# Altium PCB photo_frame-v1.2.PcbDoc (part 5 of 5)
Units mm, origin at the board's own origin, x right, y up, seen from the top; angles counter-clockwise.
Board outline 704 x 370 mm, 2 copper layers (Top Layer, Bottom Layer), stack 1.57 mm thick; 268 components, 235 nets, 1088 pads, 1398 vias.
Unrouted connection lines stored in the file: 10.
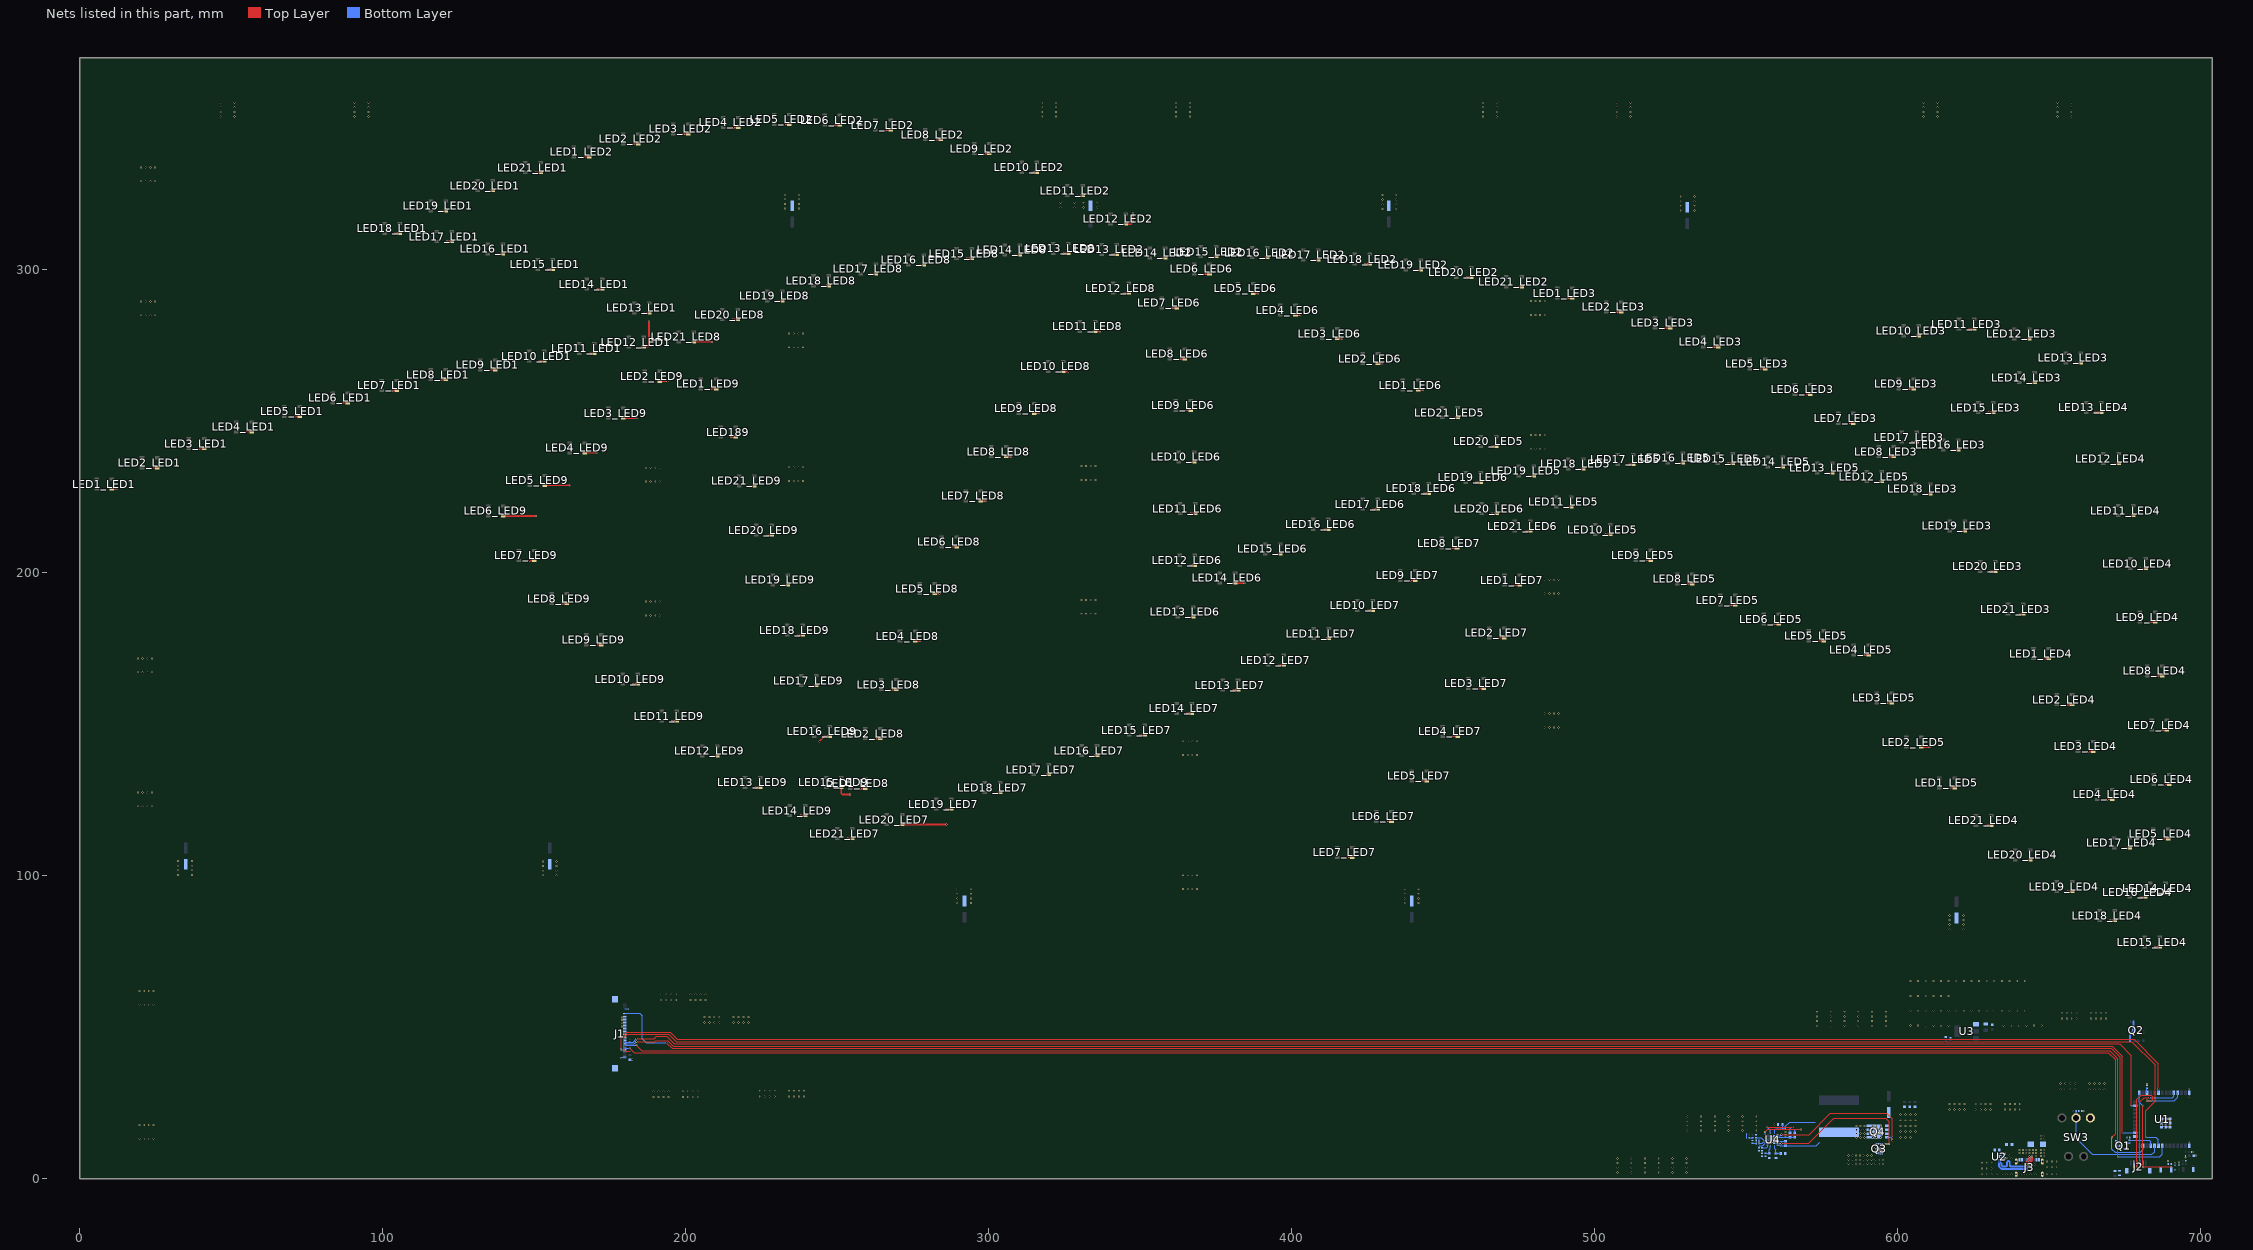
[diagram p4: the nets of this part, all layers, seen from the top]

## Via types
v1: diameter 0.6, hole 0.3, Top Layer to Bottom Layer, 709 vias
v2: diameter 0.6, hole 0.3, Top Layer to Bottom Layer, tented both sides, 689 vias

## Nets (pads, with @x,y where several pads share a name; then routed paths per layer and width w, separated by ;. In a path a pad name is that pad's centre, name@x,y a point inside that pad or via, vN(x,y) a via of type N, cw(c..) or ccw(c..) an arc to the next point about the centre after c; other vN are vias at no path point) (continued)
GND: C1.1 C2.1 C3.1 C4.1 C5.1 C6.1 C7.2 C8.1 C9.1 C10.1 C11.1 C12.1 C14.1 C15.1 C16.1 C17.1 C19.1 C20.1 C23.2 C24.2 C25.2 C26.2 C27.2 C28.2 C29.2 C30.2 C31.2 C32.2 C33.1 D1.1 D2.1 D3.1 D4.1 J1.5 J1.16 J1.17 J1.18 J1.19 J1.20 J1.21 J1.22 J1.23 J1.24 J1.25 J1.26 J1.27 J1.28 J1.29 J1.30 J1.31 J1.32 J1.37 J1.MP1 J1.MP2 J2.2 J2.MP1 J2.MP2 J3.A1/B12 J3.B1/A12 J3.S1 J3.S2 J3.S3 J3.S4 LED1_LED1.3 LED1_LED2.3 LED1_LED3.3 LED1_LED4.3 LED1_LED5.3 LED1_LED6.3 LED1_LED7.3 LED1_LED8.3 LED1_LED9.3 LED2_LED1.3 LED2_LED2.3 LED2_LED3.3 LED2_LED4.3 LED2_LED5.3 LED2_LED6.3 LED2_LED7.3 LED2_LED8.3 LED2_LED9.3 LED3_LED1.3 LED3_LED2.3 LED3_LED3.3 LED3_LED4.3 LED3_LED5.3 LED3_LED6.3 LED3_LED7.3 LED3_LED8.3 LED3_LED9.3 LED4_LED1.3 LED4_LED2.3 LED4_LED3.3 LED4_LED4.3 LED4_LED5.3 LED4_LED6.3 LED4_LED7.3 LED4_LED8.3 LED4_LED9.3 LED5_LED1.3 LED5_LED2.3 LED5_LED3.3 LED5_LED4.3 LED5_LED5.3 LED5_LED6.3 LED5_LED7.3 LED5_LED8.3 LED5_LED9.3 LED6_LED1.3 LED6_LED2.3 LED6_LED3.3 LED6_LED4.3 LED6_LED5.3 LED6_LED6.3 LED6_LED7.3 LED6_LED8.3 LED6_LED9.3 LED7_LED1.3 LED7_LED2.3 LED7_LED3.3 LED7_LED4.3 LED7_LED5.3 LED7_LED6.3 LED7_LED7.3 LED7_LED8.3 LED7_LED9.3 LED8_LED1.3 LED8_LED2.3 LED8_LED3.3 LED8_LED4.3 LED8_LED5.3 LED8_LED6.3 LED8_LED7.3 LED8_LED8.3 LED8_LED9.3 LED9_LED1.3 LED9_LED2.3 LED9_LED3.3 LED9_LED4.3 LED9_LED5.3 LED9_LED6.3 LED9_LED7.3 LED9_LED8.3 LED9_LED9.3 LED10_LED1.3 LED10_LED2.3 LED10_LED3.3 LED10_LED4.3 LED10_LED5.3 LED10_LED6.3 LED10_LED7.3 LED10_LED8.3 LED10_LED9.3 LED11_LED1.3 LED11_LED2.3 LED11_LED3.3 LED11_LED4.3 LED11_LED5.3 LED11_LED6.3 LED11_LED7.3 LED11_LED8.3 LED11_LED9.3 LED12_LED1.3 LED12_LED2.3 LED12_LED3.3 LED12_LED4.3 LED12_LED5.3 LED12_LED6.3 LED12_LED7.3 LED12_LED8.3 LED12_LED9.3 LED13_LED1.3 LED13_LED2.3 LED13_LED3.3 LED13_LED4.3 LED13_LED5.3 LED13_LED6.3 LED13_LED7.3 LED13_LED8.3 LED13_LED9.3 LED14_LED1.3 LED14_LED2.3 LED14_LED3.3 LED14_LED4.3 LED14_LED5.3 LED14_LED6.3 LED14_LED7.3 LED14_LED8.3 LED14_LED9.3 LED15_LED1.3 LED15_LED2.3 LED15_LED3.3 LED15_LED4.3 LED15_LED5.3 LED15_LED6.3 LED15_LED7.3 LED15_LED8.3 LED15_LED9.3 LED16_LED1.3 LED16_LED2.3 LED16_LED3.3 LED16_LED4.3 LED16_LED5.3 LED16_LED6.3 LED16_LED7.3 LED16_LED8.3 LED16_LED9.3 LED17_LED1.3 LED17_LED2.3 LED17_LED3.3 LED17_LED4.3 LED17_LED5.3 LED17_LED6.3 LED17_LED7.3 LED17_LED8.3 LED17_LED9.3 LED18_LED1.3 LED18_LED2.3 LED18_LED3.3 LED18_LED4.3 LED18_LED5.3 LED18_LED6.3 LED18_LED7.3 LED18_LED8.3 LED18_LED9.3 LED19_LED1.3 LED19_LED2.3 LED19_LED3.3 LED19_LED4.3 LED19_LED5.3 LED19_LED6.3 LED19_LED7.3 LED19_LED8.3 LED19_LED9.3 LED20_LED1.3 LED20_LED2.3 LED20_LED3.3 LED20_LED4.3 LED20_LED5.3 LED20_LED6.3 LED20_LED7.3 LED20_LED8.3 LED20_LED9.3 LED21_LED1.3 LED21_LED2.3 LED21_LED3.3 LED21_LED4.3 LED21_LED5.3 LED21_LED6.3 LED21_LED7.3 LED21_LED8.3 LED21_LED9.3 LED189.3 LED224.2 Q1.2 Q4.1 Q4.2 Q4.3 R3.2 R7.2 R9.2 R16.1 R17.1 R19.1 SW1.1 SW2.1 SW3.3 U1.1 U1.15 U1.38 U1.39 U1.39_10 U1.39_11 U1.39_12 U1.39_13 U1.39_14 U1.39_15 U1.39_16 U1.39_17 U1.39_18 U1.39_19 U1.39_20 U1.39_21 U1.40 U1.41 U1.42 U1.43 U1.44 U1.45 U1.46 U1.47 U2.7 U3.1 U4.6 U4.12 U4.15 U4.21 U4.22 U4.23 U4.24 U4.25 U4.26 U4.27 U4.28 U4.29 | length 369.7
  Top Layer w0.559: LED1_LED1.3@10.688,227.545 v2@12.284,227.545 ; v2@24.021,234.602 LED2_LED1.3@25.617,234.602 ; v2@39.495,240.903 LED3_LED1.3@41.091,240.903 ; v2@55.187,246.464 LED4_LED1.3@56.783,246.464 ; v2@71.037,251.569 LED5_LED1.3@72.632,251.569 ; v2@86.963,256.04 LED6_LED1.3@88.558,256.04 ; v2@103.168,260.104 LED7_LED1.3@104.763,260.104 ; v2@104.074,311.989 LED18_LED1.3@105.669,311.989 ; v2@119.297,263.71 LED8_LED1.3@120.892,263.71 ; v2@119.347,319.361 LED19_LED1.3@120.943,319.361 ; v2@121.256,309.268 LED17_LED1.3@122.852,309.268 ; v2@134.849,326.061 LED20_LED1.3@136.444,326.061 ; v2@135.617,266.928 LED9_LED1.3@137.213,266.928 ; v2@138.07,305.227 LED16_LED1.3@139.666,305.227 ; LED6_LED9.3@139.841,218.702 139.845,218.698 150.618,218.698 v2(150.622,218.694) ; v2@148.431,203.995 LED7_LED9.3@150.026,203.995 ; v2@150.564,332.036 LED21_LED1.3@152.16,332.036 ; v2@151.86,269.832 LED10_LED1.3@153.455,269.832 ; LED5_LED9.3@153.557,228.785 153.56,228.788 161.818,228.788 v2(161.821,228.791) ; v2@154.664,300.081 LED15_LED1.3@156.259,300.081 ; v2@159.226,189.796 LED8_LED9.3@160.821,189.796 ; v2@166.592,337.218 LED1_LED2.3@168.187,337.218 ; LED4_LED9.3@166.765,239.504 v2(170.688,239.504) ; v2@168.268,272.321 LED11_LED1.3@169.864,272.321 ; v2@170.605,176.182 LED9_LED9.3@172.2,176.182 ; v2@170.862,293.573 LED14_LED1.3@172.458,293.573 ; LED3_LED9.3@179.49,250.985 v2(183.896,250.985) ; v2@182.67,163.203 LED10_LED9.3@184.265,163.203 ; v2@182.822,341.511 LED2_LED2.3@184.418,341.511 ; LED12_LED1.3@186.28,274.449 186.348,274.518 187.529,274.518 187.96,274.949 v2(187.96,282.956) ; v2@186.471,285.699 LED13_LED1.3@188.067,285.699 ; LED2_LED9.3@191.504,263.152 191.508,263.148 194.052,263.148 v2(194.056,263.144) ; v2@195.522,150.985 LED11_LED9.3@197.118,150.985 ; v2@199.332,344.762 LED3_LED2.3@200.928,344.762 ; LED21_LED8.3@202.782,276.156 208.718,276.156 208.777,276.098 v2(208.788,276.098) ; v2@208.502,260.637 LED1_LED9.3@210.097,260.637 ; v2@208.883,139.53 LED12_LED9.3@210.478,139.53 ; v2@215.055,244.737 LED189.3@216.65,244.737 ; v2@215.588,283.522 LED20_LED8.3@217.184,283.522 ; v2@215.893,346.921 LED4_LED2.3@217.489,346.921 ; v2@221.125,228.633 LED21_LED9.3@222.721,228.633 ; v2@223.056,129.09 LED13_LED9.3@224.651,129.09 ; v2@226.815,212.352 LED20_LED9.3@228.411,212.352 ; v2@230.396,289.644 LED19_LED8.3@231.992,289.644 ; v2@232.174,195.943 LED19_LED9.3@233.77,195.943 ; v2@232.632,347.962 LED5_LED2.3@234.227,347.962 ; v2@237.051,179.332 LED18_LED9.3@238.647,179.332 ; v2@237.864,119.794 LED14_LED9.3@239.46,119.794 ; v2@241.612,162.67 LED17_LED9.3@243.208,162.67 ; v2(244.165,144.272) 245.841,145.948 LED16_LED9.3@247.569,145.948 ; v2@245.662,294.673 LED18_LED8.3@247.257,294.673 ; v2@249.345,347.683 LED6_LED2.3@250.94,347.683 ; LED15_LED9.3@251.414,129.078 251.414,127.105 251.742,126.778 v2(254.297,126.778) ; v2@253.465,112.233 LED21_LED7.3@255.06,112.233 ; v2@257.803,128.76 LED1_LED8.3@259.399,128.76 ; v2@261.257,298.559 LED17_LED8.3@262.853,298.559 ; v2@262.705,145.194 LED2_LED8.3@264.301,145.194 ; v2@266.083,346.032 LED7_LED2.3@267.679,346.032 ; v2@268.014,161.399 LED3_LED8.3@269.609,161.399 ; LED20_LED7.3@271.489,116.848 271.493,116.844 286.146,116.844 v2(286.149,116.84) ; LED4_LED8.3@275.807,177.376 v2@277.403,177.376 ; v2@276.991,301.555 LED16_LED8.3@278.586,301.555 ; LED5_LED8.3@282.284,193.073 v2@283.88,193.073 ; v2@282.593,342.908 LED8_LED2.3@284.189,342.908 ; v2@286.149,121.928 LED19_LED7.3@287.745,121.928 ; v2@287.978,208.516 LED6_LED8.3@289.574,208.516 ; v2@292.855,303.639 LED15_LED8.3@294.451,303.639 ; LED7_LED8.3@297.448,223.629 v2@299.043,223.629 ; v2@298.722,338.285 LED9_LED2.3@300.318,338.285 ; v2@302.253,127.363 LED18_LED7.3@303.849,127.363 ; LED8_LED8.3@305.881,238.285 v2@307.476,238.285 ; v2@308.806,304.884 LED14_LED8.3@310.402,304.884 ; v2@314.42,332.138 LED10_LED2.3@316.015,332.138 ; LED9_LED8.3@315.05,252.585 v2@316.646,252.585 ; v2@318.331,133.281 LED17_LED7.3@319.927,133.281 ; LED10_LED8.3@324.727,266.377 v2@326.323,266.377 ; v2@324.797,305.367 LED13_LED8.3@326.393,305.367 ; v2@329.482,324.416 LED11_LED2.3@331.077,324.416 ; v2@334.232,139.555 LED16_LED7.3@335.827,139.555 ; LED11_LED8.3@335.192,279.611 v2@336.788,279.611 ; v2@340.759,305.036 LED13_LED2.3@342.355,305.036 ; v2@344.646,292.209 LED12_LED8.3@346.241,292.209 ; LED12_LED2.3@345.276,315.069 347.073,315.069 347.726,315.722 v2(347.726,318.516) ; v2@349.929,146.362 LED15_LED7.3@351.524,146.362 ; v2@356.674,303.867 LED14_LED2.3@358.27,303.867 ; v2@360.602,287.336 LED7_LED6.3@362.198,287.336 ; v2@363.238,270.518 LED8_LED6.3@364.834,270.518 ; v2@365.158,253.575 LED9_LED6.3@366.754,253.575 ; v2@365.55,153.525 LED14_LED7.3@367.145,153.525 ; v2@365.931,185.377 LED13_LED6.3@367.526,185.377 ; v2@366.261,236.558 LED10_LED6.3@367.857,236.558 ; v2@366.53,202.421 LED12_LED6.3@368.125,202.421 ; v2@366.693,219.489 LED11_LED6.3@368.288,219.489 ; v2@371.37,298.564 LED6_LED6.3@372.965,298.564 ; v2@373.55,304.261 LED15_LED2.3@375.146,304.261 ; v2@380.775,161.246 LED13_LED7.3@382.371,161.246 ; LED14_LED6.3@381.369,196.578 v2(384.556,196.578) ; LED5_LED6.3@387.348,292.165 v2@388.944,292.165 ; v2@390.485,303.944 LED16_LED2.3@392.081,303.944 ; v2@394.76,206.205 LED15_LED6.3@396.355,206.205 ; v2@395.801,169.476 LED12_LED7.3@397.397,169.476 ; LED4_LED6.3@401.342,284.976 v2@402.937,284.976 ; v2@407.327,303.195 LED17_LED2.3@408.923,303.195 ; v2@410.533,214.307 LED16_LED6.3@412.129,214.307 ; v2@410.711,178.189 LED11_LED7.3@412.307,178.189 ; LED3_LED6.3@415.134,277.209 v2@416.729,277.209 ; v2@418.483,106.027 LED7_LED7.3@420.079,106.027 ; v2@424.234,301.839 LED18_LED2.3@425.83,301.839 ; v2@425.189,187.536 LED10_LED7.3@426.785,187.536 ; v2@426.942,220.937 LED17_LED6.3@428.537,220.937 ; LED2_LED6.3@428.571,268.938 v2@430.166,268.938 ; v2@431.437,117.914 LED6_LED7.3@433.033,117.914 ; v2@439.311,197.442 LED9_LED7.3@440.907,197.442 ; v2@441.076,299.925 LED19_LED2.3@442.672,299.925 ; LED1_LED6.3@441.805,260.229 v2@443.4,260.229 ; v2@443.121,131.275 LED5_LED7.3@444.717,131.275 ; v2@443.731,226.118 LED18_LED6.3@445.327,226.118 ; v2@453.053,208.059 LED8_LED7.3@454.648,208.059 ; v2@453.212,251.132 LED21_LED5.3@454.808,251.132 ; v2@453.358,145.956 LED4_LED7.3@454.953,145.956 ; v2@457.831,297.46 LED20_LED2.3@459.426,297.46 ; v2@460.876,229.751 LED19_LED6.3@462.472,229.751 ; v2@461.841,161.78 LED3_LED7.3@463.437,161.78 ; v2@465.967,241.664 LED20_LED5.3@467.562,241.664 ; v2@466.21,219.464 LED20_LED6.3@467.806,219.464 ; v2@468.699,178.468 LED2_LED7.3@470.295,178.468 ; v2@473.728,195.842 LED1_LED7.3@475.324,195.842 ; v2@474.353,294.342 LED21_LED2.3@475.948,294.342 ; v2@477.183,213.672 LED21_LED6.3@478.778,213.672 ; v2@478.405,231.906 LED19_LED5.3@480.001,231.906 ; v2@490.746,221.724 LED11_LED5.3@492.342,221.724 ; v2@491.077,290.584 LED1_LED3.3@492.672,290.584 ; v2@494.703,234.258 LED18_LED5.3@496.298,234.258 ; v2@503.624,212.555 LED10_LED5.3@505.22,212.555 ; v2@507.333,286.037 LED2_LED3.3@508.928,286.037 ; v2@511.185,235.681 LED17_LED5.3@512.781,235.681 ; v2@516.985,204.071 LED9_LED5.3@518.58,204.071 ; v2@523.411,280.754 LED3_LED3.3@525.006,280.754 ; v2@527.845,236.201 LED16_LED5.3@529.441,236.201 ; v2@530.751,196.273 LED8_LED5.3@532.347,196.273 ; v2@539.26,274.48 LED4_LED3.3@540.856,274.48 ; v2@544.094,235.999 LED15_LED5.3@545.69,235.999 ; v2@544.899,189.263 LED7_LED5.3@546.495,189.263 ; v2@554.729,267.241 LED5_LED3.3@556.325,267.241 ; v2@559.286,182.99 LED6_LED5.3@560.882,182.99 ; v2@560.552,234.927 LED14_LED5.3@562.148,234.927 ; v2@569.615,258.843 LED6_LED3.3@571.211,258.843 ; v2@574.084,177.503 LED5_LED5.3@575.679,177.503 ; v2@576.961,232.92 LED13_LED5.3@578.557,232.92 ; v2@583.904,249.288 LED7_LED3.3@585.5,249.288 ; v2@588.943,172.829 LED4_LED5.3@590.538,172.829 ; v2@593.225,230.006 LED12_LED5.3@594.82,230.006 ; v2(596.844,157.008) 596.846,157.007 598.182,157.007 LED3_LED5.3@598.184,157.005 ; v2@597.197,238.29 LED8_LED3.3@598.792,238.29 ; v2@603.867,260.634 LED9_LED3.3@605.463,260.634 ; v2@604.794,243.053 LED17_LED3.3@606.39,243.053 ; v2@605.483,278.175 LED10_LED3.3@607.079,278.175 ; LED2_LED5.3@607.861,142.4 v2(610.616,142.4) ; v2@609.282,226.008 LED18_LED3.3@610.878,226.008 ; v2(617.474,128.947) 617.476,128.945 618.875,128.945 LED1_LED5.3@618.877,128.944 ; v2@618.498,240.492 LED16_LED3.3@620.093,240.492 ; v2@620.658,213.798 LED19_LED3.3@622.254,213.798 ; v2@623.74,280.37 LED11_LED3.3@625.336,280.37 ; v2@629.362,116.562 LED21_LED4.3@630.957,116.562 ; v2@630.054,252.813 LED15_LED3.3@631.65,252.813 ; v2@630.783,200.379 LED20_LED3.3@632.378,200.379 ; v2@639.925,186.259 LED21_LED3.3@641.52,186.259 ; v2@641.955,277.165 LED12_LED3.3@643.551,277.165 ; v2(642.874,105.156) 642.878,105.16 643.927,105.16 LED20_LED4.3@643.931,105.164 ; v2@643.666,262.669 LED14_LED3.3@645.261,262.669 ; v2@648.339,171.588 LED1_LED4.3@649.935,171.588 ; v2@656.046,156.444 LED2_LED4.3@657.642,156.444 ; v2@656.063,94.716 LED19_LED4.3@657.658,94.716 ; v2@658.92,269.22 LED13_LED3.3@660.515,269.22 ; v2@663.018,140.978 LED3_LED4.3@664.614,140.978 ; v2(665.226,252.851) 665.228,252.849 667.277,252.849 LED13_LED4.3@667.279,252.848 ; v2@669.345,125.158 LED4_LED4.3@670.941,125.158 ; v2@670.223,85.14 LED18_LED4.3@671.819,85.14 ; v2@671.409,235.937 LED12_LED4.3@673.004,235.937 ; v2@675.02,109.155 LED17_LED4.3@676.615,109.155 ; v2@676.242,218.781 LED11_LED4.3@677.838,218.781 ; v2@680.178,92.89 LED16_LED4.3@681.773,92.89 ; v2@680.323,201.306 LED10_LED4.3@681.918,201.306 ; v2@683.478,183.681 LED9_LED4.3@685.074,183.681 ; v2@684.98,76.411 LED15_LED4.3@686.576,76.411 ; v2@685.899,165.903 LED8_LED4.3@687.495,165.903 ; v2@686.896,94.23 LED14_LED4.3@688.491,94.23 ; v2@687.379,148.02 LED7_LED4.3@688.974,148.02 ; v2@687.857,112.125 LED5_LED4.3@689.453,112.125 ; v2@688.092,130.092 LED6_LED4.3@689.688,130.092
  Bottom Layer w0.203: v2(178.664,39.675) 179.035,40.046 J1.5@180.165,40.046 ; C7.2@181.686,39.243 v2(182.423,39.243) ; v2(674.548,9.804) 674.553,9.809 Q1.2@675.538,9.809
  Bottom Layer w0.254: J1.37@179.985,56.046 v2@181.305,56.046
  Bottom Layer w0.305: C6.1@635.435,6.687 636.15,6.687 v1(636.168,6.706) ; J2.2@678.053,5.137 678.053,3.858 v2(678.064,3.847)
  Bottom Layer w0.381: v2@181.305,56.046 v2(181.305,56.058)
  other v1: 627.888,1.412 629.523,1.412 631.157,1.412 632.792,1.412 634.426,1.412 636.061,1.412 637.695,1.412 649.354,1.412 650.988,1.412 652.623,1.412 507.619,2.032 512.166,2.032 516.712,2.032 521.259,2.032 525.805,2.032 530.352,2.032 627.888,3.302 629.523,3.302 631.157,3.302 507.619,3.556 512.166,3.556 516.712,3.556 521.259,3.556 525.805,3.556 530.352,3.556 649.354,3.702 650.988,3.702 652.623,3.702 507.619,5.08 512.166,5.08 516.712,5.08 521.259,5.08 525.805,5.08 530.352,5.08 627.888,5.192 629.523,5.192 631.157,5.192 649.354,5.592 650.988,5.592 652.623,5.592 507.619,6.604 512.166,6.604 516.712,6.604 521.259,6.604 525.805,6.604 530.352,6.604 637.695,6.706 633.158,7.211 634.047,7.211 647.399,7.476 648.488,7.476 636.932,7.637 647.399,8.458 648.488,8.458 647.399,9.44 648.488,9.44 561.734,12.974 647.399,13.131 648.488,13.131 19.816,13.161 21.34,13.161 22.864,13.161 24.388,13.161 601.072,13.594 602.706,13.594 604.341,13.594 555.871,13.619 647.399,14.112 648.488,14.112 563.055,15.395 601.072,15.484 602.706,15.484 604.341,15.484 605.975,15.484 530.661,15.876 535.208,15.876 539.754,15.876 544.301,15.876 548.847,15.876 553.394,15.876 601.072,17.374 602.706,17.374 604.341,17.374 605.975,17.374 530.661,17.4 535.208,17.4 539.754,17.4 544.301,17.4 548.847,17.4 553.394,17.4 19.816,17.707 21.34,17.707 22.864,17.707 24.388,17.707 559.347,17.877 530.661,18.924 535.208,18.924 539.754,18.924 544.301,18.924 548.847,18.924 553.394,18.924 601.072,19.263 602.706,19.263 604.341,19.263 605.975,19.263 530.661,20.448 535.208,20.448 539.754,20.448 544.301,20.448 548.847,20.448 553.394,20.448 601.072,21.153 602.706,21.153 604.341,21.153 605.975,21.153 617.233,22.742 618.867,22.742 620.502,22.742 622.136,22.742 625.856,22.742 627.491,22.742 629.125,22.742 630.76,22.742 635.508,22.742 637.143,22.742 638.777,22.742 640.412,22.742 617.233,24.632 618.867,24.632 620.502,24.632 622.136,24.632 625.856,24.632 627.491,24.632 629.125,24.632 630.76,24.632 635.508,24.632 637.143,24.632 638.777,24.632 640.412,24.632 189.484,26.924 191.119,26.924 192.753,26.924 194.388,26.924 199.136,26.924 200.771,26.924 202.405,26.924 204.04,26.924 224.536,27.066 226.171,27.066 227.805,27.066 229.44,27.066 234.188,27.066 235.823,27.066 237.457,27.066 239.092,27.066 189.484,28.814 191.119,28.814 192.753,28.814 194.388,28.814 199.136,28.814 200.771,28.814 202.405,28.814 204.04,28.814 224.536,28.956 226.171,28.956 227.805,28.956 229.44,28.956 234.188,28.956 235.823,28.956 237.457,28.956 239.092,28.956 653.796,29.464 655.431,29.464 657.065,29.464 658.7,29.464 663.448,29.464 665.083,29.464 666.717,29.464 668.352,29.464 653.796,31.354 655.431,31.354 657.065,31.354 658.7,31.354 663.448,31.354 665.083,31.354 666.717,31.354 668.352,31.354 573.472,50.456 578.019,50.456 582.565,50.456 587.112,50.456 591.659,50.456 596.205,50.456 609.371,50.458 611.886,50.458 614.401,50.458 616.915,50.458 635.055,50.458 637.569,50.458 640.084,50.458 642.599,50.458 604.342,50.47 606.857,50.47 645.113,50.47 647.628,50.47 206.248,51.45 207.883,51.45 209.517,51.45 211.152,51.45 215.9,51.45 217.535,51.45 219.169,51.45 220.804,51.45 573.472,51.98 578.019,51.98 582.565,51.98 587.112,51.98 591.659,51.98 596.205,51.98 654.304,52.832 655.939,52.832 657.573,52.832 659.208,52.832 663.956,52.832 665.591,52.832 667.225,52.832 668.86,52.832 206.248,53.34 207.883,53.34 209.517,53.34 211.152,53.34 215.9,53.34 217.535,53.34 219.169,53.34 220.804,53.34 573.472,53.504 578.019,53.504 582.565,53.504 587.112,53.504 591.659,53.504 596.205,53.504 654.304,54.722 655.939,54.722 657.573,54.722 659.208,54.722 663.956,54.722 665.591,54.722 667.225,54.722 668.86,54.722 573.472,55.028 578.019,55.028 582.565,55.028 587.112,55.028 591.659,55.028 596.205,55.028 604.342,55.38 606.857,55.38 609.371,55.373 611.886,55.369 614.401,55.369 616.915,55.369 619.43,55.369 621.944,55.369 624.459,55.369 626.974,55.369 629.488,55.369 632.003,55.369 634.517,55.369 637.032,55.369 639.547,55.369 642.061,55.369 19.816,57.357 21.34,57.357 22.864,57.357 24.388,57.357 192.024,58.928 193.659,58.928 195.293,58.928 196.928,58.928 201.676,58.928 203.311,58.928 204.945,58.928 206.58,58.928 604.342,60.291 606.857,60.291 609.371,60.287 611.886,60.28 614.401,60.28 616.915,60.28 192.024,60.818 193.659,60.818 195.293,60.818 196.928,60.818 201.676,60.818 203.311,60.818 204.945,60.818 206.58,60.818 19.816,61.903 21.34,61.903 22.864,61.903 24.388,61.903 611.886,65.19 614.401,65.19 616.915,65.19 619.43,65.19 621.944,65.19 624.459,65.19 626.974,65.19 629.488,65.19 632.003,65.19 634.517,65.19 637.032,65.19 639.547,65.19 642.061,65.19 604.342,65.202 606.857,65.202 609.371,65.202 617.245,82.296 621.792,82.296 617.245,83.82 621.792,83.82 617.245,85.344 621.792,85.344 617.245,86.868 621.792,86.868 289.722,90.921 294.268,90.921 437.413,90.932 441.96,90.932 289.722,92.445 294.268,92.445 437.413,92.456 441.96,92.456 289.722,93.969 294.268,93.969 437.413,93.98 441.96,93.98 289.722,95.493 294.268,95.493 437.413,95.504 441.96,95.504 364.232,95.577 365.756,95.577 367.28,95.577 368.804,95.577 152.933,100.076 157.48,100.076 364.232,100.123 365.756,100.123 367.28,100.123 368.804,100.123 32.534,100.204 37.081,100.204 152.933,101.6 157.48,101.6 32.534,101.728 37.081,101.728 152.933,103.124 157.48,103.124 32.534,103.252 37.081,103.252 152.933,104.648 157.48,104.648 32.534,104.776 37.081,104.776 19.308,122.889 20.832,122.889 22.356,122.889 23.88,122.889 19.308,127.435 20.832,127.435 22.356,127.435 23.88,127.435 364.232,139.773 365.756,139.773 367.28,139.773 368.804,139.773 364.232,144.319 365.756,144.319 367.28,144.319 368.804,144.319 483.612,148.917 485.136,148.917 486.66,148.917 488.184,148.917 483.612,153.463 485.136,153.463 486.66,153.463 488.184,153.463 19.308,167.085 20.832,167.085 22.356,167.085 23.88,167.085 19.308,171.631 20.832,171.631 22.356,171.631 23.88,171.631 186.948,185.881 188.472,185.881 189.996,185.881 191.52,185.881 330.712,186.389 332.236,186.389 333.76,186.389 335.284,186.389 186.948,190.427 188.472,190.427 189.996,190.427 191.52,190.427 330.712,190.935 332.236,190.935 333.76,190.935 335.284,190.935 483.612,193.113 485.136,193.113 486.66,193.113 488.184,193.113 483.612,197.659 485.136,197.659 486.66,197.659 488.184,197.659 186.948,230.077 188.472,230.077 189.996,230.077 191.52,230.077 234.184,230.197 235.708,230.197 237.232,230.197 238.756,230.197 330.712,230.585 332.236,230.585 333.76,230.585 335.284,230.585 186.948,234.623 188.472,234.623 189.996,234.623 191.52,234.623 234.184,234.743 235.708,234.743 237.232,234.743 238.756,234.743 330.712,235.131 332.236,235.131 333.76,235.131 335.284,235.131 479.04,240.865 480.564,240.865 482.088,240.865 483.612,240.865 479.04,245.411 480.564,245.411 482.088,245.411 483.612,245.411 234.184,274.393 235.708,274.393 237.232,274.393 238.756,274.393 234.184,278.939 235.708,278.939 237.232,278.939 238.756,278.939 20.324,284.941 21.848,284.941 23.372,284.941 24.896,284.941 479.04,285.061 480.564,285.061 482.088,285.061 483.612,285.061 20.324,289.487 21.848,289.487 23.372,289.487 24.896,289.487 479.04,289.607 480.564,289.607 482.088,289.607 483.612,289.607 528.527,319.528 533.073,319.528 430.059,320.042 434.606,320.042 232.88,320.157 237.427,320.157 331.373,320.526 335.92,320.526 323.832,320.572 328.378,320.572 528.527,321.052 533.073,321.052 430.059,321.566 434.606,321.566 232.88,321.681 237.427,321.681 331.373,322.05 335.92,322.05 323.832,322.096 328.378,322.096 528.527,322.576 533.073,322.576 430.059,323.09 434.606,323.09 232.88,323.205 237.427,323.205 528.527,324.1 533.073,324.1 430.059,324.614 434.606,324.614 232.88,324.729 237.427,324.729 20.324,329.137 21.848,329.137 23.372,329.137 24.896,329.137 20.324,333.683 21.848,333.683 23.372,333.683 24.896,333.683 46.601,350.524 51.147,350.524 90.797,350.524 95.343,350.524 317.736,350.524 322.283,350.524 361.932,350.524 366.479,350.524 463.197,350.524 467.743,350.524 507.393,350.524 511.939,350.524 608.657,350.524 613.203,350.524 652.853,350.524 657.399,350.524 46.601,352.048 51.147,352.048 90.797,352.048 95.343,352.048 317.736,352.048 322.283,352.048 361.932,352.048 366.479,352.048 463.197,352.048 467.743,352.048 507.393,352.048 511.939,352.048 608.657,352.048 613.203,352.048 652.853,352.048 657.399,352.048 46.601,353.572 51.147,353.572 90.797,353.572 95.343,353.572 317.736,353.572 322.283,353.572 361.932,353.572 366.479,353.572 463.197,353.572 467.743,353.572 507.393,353.572 511.939,353.572 608.657,353.572 613.203,353.572 652.853,353.572 657.399,353.572 46.601,355.096 51.147,355.096 90.797,355.096 95.343,355.096 317.736,355.096 322.283,355.096 361.932,355.096 366.479,355.096 463.197,355.096 467.743,355.096 507.393,355.096 511.939,355.096 608.657,355.096 613.203,355.096 652.853,355.096 657.399,355.096
  other v2: 640.704,1.412 642.338,1.412 643.973,1.412 645.607,1.412 697.665,4.579 691.62,5.214 692.966,5.264 689.311,5.767 695.071,6.833 698.551,7.595 697.687,8.712 696.316,11.938 661.467,22.301 696.333,27.036 696.333,29.563 682.374,31.249 179.07,50.216 179.07,51.249 179.07,52.282 179.07,53.196 684.98,76.414 670.223,85.136 680.178,92.886 686.896,94.227 656.063,94.713 418.483,106.024 675.02,109.152 687.857,112.122 253.465,112.229 629.362,116.558 431.437,117.911 237.864,119.791 286.149,121.924 669.345,125.155 302.253,127.36 257.803,128.757 223.056,129.087 688.092,130.089 443.121,131.271 318.331,133.278 208.883,139.526 334.232,139.552 663.018,140.975 262.705,145.191 453.358,145.953 349.929,146.359 687.379,148.016 195.522,150.982 365.55,153.522 656.046,156.44 380.775,161.242 268.014,161.396 461.841,161.777 241.612,162.667 182.67,163.199 685.899,165.9 395.801,169.473 648.339,171.585 588.943,172.826 170.605,176.179 277.403,177.379 574.084,177.499 410.711,178.185 468.699,178.465 237.051,179.328 559.286,182.987 683.478,183.678 365.931,185.373 639.925,186.256 425.189,187.532 544.899,189.26 159.226,189.793 283.88,193.076 473.728,195.838 232.174,195.94 530.751,196.27 439.311,197.438 630.783,200.376 680.323,201.303 366.53,202.418 148.431,203.992 516.985,204.068 394.76,206.201 453.053,208.056 287.978,208.52 226.815,212.348 503.624,212.551 477.183,213.669 620.658,213.795 410.533,214.304 676.242,218.777 466.21,219.46 366.693,219.486 426.942,220.933 490.746,221.721 299.043,223.633 609.282,226.005 443.731,226.115 12.284,227.542 221.125,228.63 460.876,229.747 593.225,230.002 478.405,231.903 576.961,232.917 494.703,234.254 24.021,234.599 560.552,234.923 511.185,235.678 671.409,235.934 544.094,235.996 527.845,236.198 366.261,236.554 307.476,238.288 597.197,238.286 618.498,240.489 39.495,240.899 465.967,241.668 604.794,243.05 215.055,244.733 55.187,246.46 583.904,249.285 453.212,251.135 71.037,251.566 316.646,252.589 630.054,252.81 365.158,253.571 86.963,256.036 569.615,258.84 103.168,260.1 443.4,260.232 208.502,260.634 603.867,260.631 643.666,262.665 119.297,263.707 326.323,266.374 135.617,266.925 554.729,267.238 430.166,268.941 658.92,269.217 151.86,269.828 363.238,270.514 168.268,272.318 539.26,274.477 641.955,277.161 416.729,277.213 605.483,278.171 336.788,279.607 623.74,280.366 523.411,280.75 215.588,283.519 402.937,284.98 186.471,285.695 507.333,286.034 360.602,287.333 230.396,289.64 491.077,290.58 388.944,292.168 344.646,292.206 170.862,293.57 474.353,294.338 245.662,294.67 457.831,297.456 261.257,298.556 371.37,298.567 441.076,299.693 154.664,300.077 276.991,301.552 424.234,301.835 407.327,303.191 292.855,303.636 356.674,303.863 390.485,303.941 373.55,304.258 308.806,304.88 340.759,305.033 138.07,305.224 324.797,305.364 121.256,309.265 104.074,311.986 119.347,319.358 329.482,324.413 134.849,326.058 150.564,332.033 314.42,332.135 166.592,337.215 298.722,338.281 182.822,341.507 282.593,342.904 199.332,344.758 266.083,346.028 215.893,346.917 249.345,347.679 232.632,347.959
IO0: C4.2 D3.2 J2.5 SW2.2 U1.25 | length 35.5
  Top Layer w0.305: v2@681.064,24.017 v2(681.064,3.847) v2(690.342,3.847)
  Bottom Layer w0.305: U1.25@679.823,28.3 679.823,25.258 v2(681.047,24.035) ; J2.5@681.053,5.137 681.053,3.858 v2(681.064,3.847)
LED_BCKL: R4.1 R7.1 U1.11 | length 8.5
  Bottom Layer w0.305: R4.1@676.659,12.656 683.06,12.656 683.633,12.082 U1.11@683.633,10.8
LED_BRIGHTNESS: R2.2 R3.1 SW3.2 U1.10 | length 39.5
  Bottom Layer w0.305: R2.2@659.031,22.333 659.031,20.007 SW3.2@658.996,20.007 658.996,13.342 664.381,7.957 684.033,7.957 684.903,8.827 U1.10@684.903,10.8
LED_K: J1.34 J1.35 J1.36 R10.2 | length 532.7
  Top Layer w0.305: v2(193.7,44.806) 195.574,42.932 670.546,42.932 673.481,39.998 v2(673.481,12.319)
  Bottom Layer w0.305: J1.34@180.165,54.546 184.9,54.546 185.71,53.735 185.71,46.141 187.046,44.806 v2(193.7,44.806) ; R10.2@672.29,12.287 673.449,12.287 v2(673.481,12.319)
NetC6_2: C6.2 U2.3
NetC8_2: C8.2 R11.1 U4.20 | length 4.2
  Bottom Layer w0.254: U4.20@559.537,10.694 559.537,9.826 559.914,9.449 C8.2@559.914,8.28 R11.1@561.518,8.28
NetC13_1: C13.1 U4.17 | length 2.7
  Bottom Layer w0.254: U4.17@560.437,12.094 561.035,12.094 561.297,12.356 C13.1@563.055,12.356
NetC13_2: C13.2 L1.1 Q3.1 Q3.2 Q3.3 Q4.5 Q4.6 Q4.7 Q4.8 Q4.9 R13.2 U4.19 | length 25.5
  Bottom Layer w0.254: U4.19@560.437,11.094 561.057,11.094 561.319,10.832 C13.2@563.055,10.832
  Bottom Layer w0.381: C13.2@563.055,10.832 573.239,10.832 574.319,11.913 ; R13.2@563.055,16.485 563.055,17.234 564.414,18.593 572.845,18.593
  other v1: 586.495,13.564 587.824,13.564 589.153,13.564 591.761,13.564 593.09,13.564 594.419,13.564 586.495,14.834 587.824,14.834 589.153,14.834 591.761,14.834 593.09,14.834 594.419,14.834 586.495,16.104 587.824,16.104 589.153,16.104 591.761,16.104 593.09,16.104 594.419,16.104 586.495,17.374 587.824,17.374 589.153,17.374 591.761,17.374 593.09,17.374 594.419,17.374
NetC18_1: C18.1 C22.2 R15.1 R19.2 R22.2 U4.5 | length 5.2
  Bottom Layer w0.254: C18.1@551.154,13.474 R15.1@552.242,13.474 ; R19.2@553.394,13.474 554.989,13.474 555.869,12.594 U4.5@557.137,12.594
NetC18_2: C18.2 R14.1 | length 1
  Bottom Layer w0.254: C18.2@550.215,13.474 R14.1@550.215,14.519
NetC19_2: C19.2 R13.1 U4.11 | length 5.1
  Bottom Layer w0.254: U4.11@559.537,14.994 559.537,16.047 559.975,16.485 R13.1@562.115,16.485 C19.2@562.115,17.805
NetC20_2: C20.2 R18.1 R21.1 U4.14 | length 6.5
  Bottom Layer w0.254: U4.14@560.437,13.594 C20.2@563.055,13.594 563.817,13.594 ; R21.1@564.579,13.594 563.817,13.594 ; R18.1@566.141,13.594 563.817,13.594
NetC21_1: C21.1 C22.1 U4.4 | length 4
  Bottom Layer w0.254: C22.1@554.334,12.594 C21.1@554.334,11.594 555.371,11.594 555.871,12.094 U4.4@557.137,12.094
NetC21_2: C21.2 R22.1 | length 1.2
  Bottom Layer w0.254: R22.1@552.242,11.624 552.257,11.609 553.379,11.609 C21.2@553.394,11.594
NetC33_2: C33.2 U4.3 | length 3.6
  Bottom Layer w0.254: C33.2@554.364,10.16 554.364,10.631 554.613,10.881 555.616,10.881 556.329,11.594 U4.3@557.137,11.594
NetLED224_1: LED224.1 R20.2
NetQ1_1: Q1.1 R4.2 | length 1.1
  Bottom Layer w0.203: Q1.1@675.538,11.709 Q1.1@675.545,11.716
  Bottom Layer w0.305: Q1.1@675.545,11.716 R4.2@676.659,11.716
NetQ1_3: Q1.3 R10.1 | length 1.2
  Bottom Layer w0.203: R10.1@672.29,10.763 R10.1@672.294,10.759
  Bottom Layer w0.305: R10.1@672.294,10.759 Q1.3@673.538,10.759
NetQ2_3: Q2.3 R6.1 R8.1 | length 6.8
  Bottom Layer w0.559: R8.1@676.81,45.502 676.81,47.766 677.739,48.696 677.739,48.746 677.87,48.876 Q2.3@677.92,48.876 ; Q2.3@677.929,48.886 R6.1@677.929,51.816
NetQ3_4: Q3.4 U4.18 | length 51.4
  Top Layer w0.381: v1(561.734,11.594) 570.728,11.594 579.073,19.939 596.138,19.939 597.261,18.816 v1(597.261,11.43) v1(596.265,11.43)
  Bottom Layer w0.254: U4.18@560.437,11.594 v1(561.734,11.594)
  Bottom Layer w0.381: Q3.4@594.959,11.455 594.972,11.443 596.252,11.443 v1(596.265,11.43) ; v1@596.278,11.443 v1@597.261,11.443
NetQ4_4: Q4.4 U4.13 | length 51.6
  Top Layer w0.381: v1(561.734,14.534) 570.936,14.534 577.924,21.522 596.52,21.522 598.297,19.746 v1(598.297,13.564) v1(598.297,12.553)
  Bottom Layer w0.254: U4.13@560.437,14.094 561.294,14.094 v1(561.734,14.534)
  Bottom Layer w0.381: Q4.4@596.601,13.564 v1(598.297,13.564) ; v1@598.31,12.553 v1@598.31,13.551
NetR9_1: R9.1 U1.27 | length 1.5
  Bottom Layer w0.305: U1.27@682.374,28.31 R9.1@682.374,29.763
  Bottom Layer w0.559: U1.27@682.363,28.3 U1.27@682.374,28.31
NetR12_1: R12.1 R17.2 U4.1 | length 3.7
  Bottom Layer w0.254: R12.1@556.525,8.319 557.716,8.319 R17.2@557.729,8.306 557.729,9.449 558.037,9.757 U4.1@558.037,10.694
NetR16_2: R16.2 U4.2 | length 2.5
  Bottom Layer w0.254: R16.2@555.371,10.16 556.8,10.16 557.137,10.497 U4.2@557.137,11.094
NetR18_2: R18.2 U4.8 | length 17.1
  Top Layer w0.254: v2(556.329,15.395) 557.203,16.269 568.134,16.269 v2(568.173,16.231)
  Bottom Layer w0.254: v2(556.329,15.395) 556.329,14.392 556.627,14.094 U4.8@557.137,14.094 ; R18.2@566.141,15.118 566.141,15.879 566.492,16.231 v2(568.173,16.231)
NetR21_2: R21.2 U4.10 | length 13.7
  Top Layer w0.254: v2(556.997,16.917) v2(565.607,16.917) ; v2@556.997,17.044 v2@557.063,16.977
  Bottom Layer w0.254: v2(556.997,16.917) 558.037,15.876 U4.10@558.037,14.994 ; R21.2@564.579,15.118 564.579,16.594 564.901,16.917 v2(565.607,16.917)
RESET: J1.15 R23.2 U1.23 | length 518.6
  Top Layer w0.305: v2(183.794,46.152) 189.611,46.152 190.422,46.962 193.82,46.962 196.333,44.449 673.342,44.449 677.234,40.557 v2(677.234,24)
  Bottom Layer w0.305: J1.15@179.985,45.046 182.688,45.046 v2(183.794,46.152) ; v2(677.234,24) U1.23@678.573,24
RXD: J2.4 U1.34 | length 35.9
  Top Layer w0.305: v2(680.064,3.847) 680.064,25.307 681.428,26.67 v1(683.26,26.67)
  Bottom Layer w0.305: J2.4@680.053,5.137 680.053,3.858 v2(680.064,3.847) ; v1(683.26,26.67) 690.828,26.67 691.253,27.096 U1.34@691.253,28.3
SPI_A0: J1.10 U1.30 | length 527.5
  Top Layer w0.305: v2@178.755,42.546 178.755,46.462 180.631,48.337 194.941,48.337 197.336,45.942 678.186,45.942 686.167,37.962 v2(686.167,29.646)
  Bottom Layer w0.305: v2@178.755,42.546 J1.10@180.165,42.546 ; U1.30@686.173,28.3 v2@686.173,29.639
  other v2: 178.746,42.555
SPI_CS: J1.9 U1.9 | length 549.6
  Top Layer w0.305: v2(181.585,42.037) 180.174,42.037 179.578,42.633 179.578,46.459 180.736,47.617 194.528,47.617 196.944,45.201 677.414,45.201 685.13,37.486 685.13,25.52 681.993,22.383 v1(681.993,13.707)
  Bottom Layer w0.305: J1.9@179.985,42.046 181.575,42.046 v2(181.585,42.037) ; v1(681.993,13.707) 685.301,13.707 686.173,12.835 U1.9@686.173,10.8
SPI_SCL: J1.11 U1.13 | length 535.9
  Top Layer w0.305: v2(181.585,43.055) 183.125,41.514 669.657,41.514 672.033,39.138 672.033,14.777 v1(670.814,13.558)
  Bottom Layer w0.305: J1.11@179.985,43.046 v2@181.575,43.046 ; v1(670.814,13.558) 670.814,9.668 671.851,8.631 680.105,8.631 681.093,9.619 U1.13@681.093,10.8
SPI_SDA: J1.13 U1.8 | length 544.9
  Top Layer w0.305: v2(183.794,44.069) 185.649,42.215 670.064,42.215 672.744,39.534 v1(672.744,7.112)
  Bottom Layer w0.305: J1.13@179.985,44.046 183.771,44.046 v2(183.794,44.069) ; v1(672.744,7.112) 686.562,7.112 687.443,7.993 U1.8@687.443,10.8
SPI_SDO: J1.14 U1.16 | length 526.3
  Top Layer w0.305: v2(183.794,45.187) 189.916,45.187 190.195,45.466 194.158,45.466 195.936,43.688 670.912,43.688 674.218,40.382 v2(674.218,15.103)
  Bottom Layer w0.305: J1.14@179.985,44.546 183.154,44.546 v2(183.794,45.187) ; v2(674.218,15.103) U1.16@678.567,15.103
TXD: J2.3 U1.35 | length 44.7
  Top Layer w0.305: v2(679.064,3.847) 679.064,26.161 680.453,27.55 683.796,27.55 684.276,27.07 684.276,26.162 683.834,25.72 v1(682.374,25.72)
  Bottom Layer w0.305: J2.3@679.053,5.137 679.053,3.858 v2(679.064,3.847) ; v1(682.374,25.72) 691.454,25.72 692.523,26.789 U1.35@692.523,28.3
USB_D_N: J3.A7 J3.B7 U2.5 | length 19.3
  Top Layer w0.61: 643.414,4.989 644.413,5.989 v2(644.413,7.246) ; v1(643.413,4.623) 643.414,4.989
  Bottom Layer w0.203: J3.A7@643.274,6.162 643.274,4.762 v1(643.413,4.623) ; J3.B7@644.274,6.162 644.272,6.165 644.272,7.104 v2(644.413,7.246)
  Bottom Layer w0.305: 633.525,4.953 633.677,5.105 633.677,6.149 U2.5@633.606,6.22
  Bottom Layer w0.61: 633.525,4.953 633.525,4.007 634.407,3.124 642.442,3.124 643.413,4.095 v1(643.413,4.623)
USB_D_P: J3.A6 J3.B6 U2.4 | length 19.3
  Top Layer w0.61: v1(642.601,4.652) 642.601,5.326 643.6,6.326 v2(643.6,7.246)
  Bottom Layer w0.203: v1@642.774,4.652 J3.B6@642.774,6.162 ; v2(643.6,7.246) 643.635,7.246 643.777,7.104 643.777,6.165 J3.A6@643.774,6.162
  Bottom Layer w0.305: U2.4@634.256,6.22 634.185,6.149 634.185,5.105 634.337,4.953
  Bottom Layer w0.61: 634.337,4.953 634.337,4.343 634.555,4.126 634.744,3.937 635.612,3.937 ccw(c635.612,4.547) 636.222,4.547 636.222,5.325 cw(c636.654,5.325) 637.086,5.325 637.086,4.547 ccw(c637.695,4.547) 637.695,3.937 640.591,3.937 642.106,3.937 642.6,4.432 v1(642.601,4.652)
VBUS: C5.2 C14.2 F1.2 Q3.5 Q3.6 Q3.7 Q3.8 R11.2 R12.2 U2.2
  other v1: 583.829,4.9 585.099,4.9 586.369,4.9 587.639,4.9 588.909,4.9 590.179,4.9 591.449,4.9 592.719,4.9 593.989,4.9 595.259,4.9 583.829,6.23 585.099,6.23 586.369,6.23 587.639,6.23 588.909,6.23 590.179,6.23 591.449,6.23 592.719,6.23 593.989,6.23 595.259,6.23 583.829,7.559 585.099,7.559 586.369,7.559 587.639,7.559 588.909,7.559 590.179,7.559 591.449,7.559 592.719,8.911 593.989,8.911 595.259,8.911 592.719,10.24 593.989,10.24 595.259,10.24
VBUS#: D1.2 F1.1 J3.A4/B9 J3.B4/A9
  other v1: 645.353,4.623 645.801,7.334 640.36,8.458 641.448,8.458 642.537,8.458 643.625,8.458 644.713,8.458 645.801,8.458 640.36,9.44 641.448,9.44 642.537,9.44 643.625,9.44 644.713,9.44 645.801,9.44
pads on no net: J1.1 J1.2 J1.3 J1.4 J1.8 J3.A8 J3.B8 J3.MH LED189.2 SW3.4 SW3.5 U1.4 U1.5 U1.6 U1.7 U1.12 U1.14 U1.17 U1.18 U1.19 U1.20 U1.21 U1.22 U1.24 U1.28 U1.29 U1.31 U1.32 U1.33 U1.36 U1.37 U4.7 U4.9 U4.16

## Polygon pours and split planes (outlines as drawn)
5V on Bottom Layer "5V_L02_P013" (solid, pour order 13): 646.019,30.323 642.112,26.416 608.123,26.416 606.398,24.683 595.675,24.683 593.979,22.987 258.445,22.987 211.328,70.104 175.26,106.172 30.48,106.172 30.48,227.642 156.767,265.225 156.816,265.274 182.39,273.83 227.584,319.024 339.344,319.024 339.344,309.372 337.312,307.34 307.34,307.34 305.308,305.308 276.48,305.308 271.4,300.228 247.288,300.228 237.89,290.83 220.218,290.83 207.264,277.876 188.722,259.334 181.864,252.476 147.32,217.932 147.32,203.693 155.621,195.392 155.621,188.868 191.466,153.024 191.466,152.206 200.465,143.207 205.099,143.207 205.099,140.515 212.794,132.82 219.161,132.82 219.161,130.285 224.986,124.46 234.95,124.46 234.95,118.618 238.506,118.618 243.144,123.256 243.144,131.117 cw(c245.684,131.117) 243.888,132.913 245.134,134.159 ccw(c243.339,135.954) 245.878,135.955 245.878,235.972 312.67,302.764 370.739,302.764 370.739,291.5 368.639,289.4 352.966,289.4 345.956,296.41 344.312,296.41 342.542,294.64 336.089,294.64 335.026,293.577 335.026,285.801 331.636,282.411 326.841,282.411 324.612,280.181 324.612,272.963 320.49,268.841 314.383,268.841 310.666,265.124 310.666,249.198 302.613,241.145 295.36,241.145 292.994,238.779 292.994,217.506 282.956,207.468 282.956,198.262 281.968,197.274 279.552,197.274 276.606,194.328 276.606,184.085 271.733,179.212 271.733,170.45 263.014,161.731 263.014,150.272 260.762,150.272 258.318,147.828 258.318,133.813 251.334,126.828 251.334,111.672 252.008,110.998 255.27,110.998 256.54,112.268 256.54,119.888 314.706,178.054 379.73,178.054 384.897,183.221 412.449,183.221 412.449,179.879 412.496,179.832 402.844,179.832 385.826,162.814 370.571,162.814 355.585,147.828 338.836,147.828 325.882,134.874 305.562,134.874 294.386,123.698 284.988,123.698 284.988,89.408 375.92,89.408 441.198,154.686 441.198,182.372 456.438,197.612 456.438,223.266 461.768,223.266 463.001,222.033 463.001,218.964 464.161,217.804 472.895,217.804 473.726,216.972 473.726,200.676 465.582,192.532 465.582,168.91 451.866,155.194 451.866,143.51 429.514,121.158 429.514,114.808 422.91,108.204 418.338,108.204 417.576,107.442 417.576,93.472 421.64,89.408 443.484,89.408 501.142,147.066 501.142,207.246 501.252,207.182 644.994,89.408 528.32,89.408 525.78,86.868 525.78,50.009 529.882,45.907 555.581,46.145 555.784,45.942 623.468,45.942 623.468,47.168 646.019,47.168
NetC13_2 on Bottom Layer "NETC13_2_L02_P012" (solid, pour order 12): 591.158,11.13 590.187,10.16 573.426,10.16 572.375,11.211 572.375,19.544 573.532,20.701 593.979,20.701 594.859,19.821 594.859,12.703 594.559,12.403 594.559,11.13
VBUS on Bottom Layer "VBUS_L02_P010" (solid, pour order 10): 621.411,11.303 621.411,0.508 553.077,0.508 553.077,7.608 556.843,7.608 556.843,4.318 557.351,3.81 562.28,3.81 562.661,4.191 562.661,8.725 590.393,8.725 592.336,10.668 603.758,10.668 614.426,21.336 635.508,21.336 636.594,20.25 636.594,9.44 636.114,8.96 633.25,8.96 633.25,10.523 632.471,11.303
VBUS# on Bottom Layer "VBUS#_L02_P009" (solid, pour order 9): 638.175,21.336 637.159,20.32 637.159,10.434 640.824,6.769 640.824,5.562 641.424,5.562 641.424,6.775 641.889,7.239 642.696,7.239 643.458,8.001 644.617,8.001 645.124,7.493 645.124,5.164 644.624,4.664 644.624,3.753 644.911,3.467 645.904,3.467 646.224,3.787 646.224,19.764 644.652,21.336
GND on Bottom Layer "GND_L02_P014" (solid, remove dead copper, pour order 14): 0,0 704,0 704,370 0,370
3V3 on Bottom Layer "3V3_L02_P004" (solid, remove dead copper, pour order 4): 651.104,49.733 651.104,23.571 658.32,23.571 658.32,22.016 656.565,22.016 656.565,17.407 647.37,17.407 647.37,47.498 621.64,47.498 621.64,46.533 618.556,46.533 618.556,51.716 621.665,51.716 621.665,49.733
VBUS# on Top Layer "VBUS#_L01_P011" (solid, pour order 11): 637.676,8.001 637.413,8.264 637.413,9.821 637.746,10.154 645.885,10.154 646.414,9.613 646.414,4.209 644.624,4.209 644.624,5.248 645.043,5.666 645.043,7.575 644.617,8.001
GND on Top Layer "GND_L01_P000" (solid, remove dead copper, pour order 0): 0,0 704,0 704,370 0,370

## Other copper
Top Layer:
  rectangle net NetQ4_4: 561.285,14.169 562.192,14.886
  rectangle net NetQ3_4: 561.285,11.23 562.192,11.946
  rectangle net VBUS: 583.184,4.318 595.884,10.668
  rectangle net NetC13_2: 583.184,12.703 594.868,18.248
Bottom Layer:
  rectangle net 5V: 550.926,14.185 552.56,14.836
  region net 5V: 637.593,175.433 628.91,183.251 572.33,120.413 581.013,112.595
  rectangle net 5V: 297.688,284.48 303.022,307.086
  rectangle net 5V: 265.43,254 272.288,302.514
  rectangle net 5V: 653.593,282.956 670.306,291.892
  rectangle net 5V: 348.488,172.72 359.156,297.18
  rectangle net NetC18_1: 551.925,12.276 553.712,13.703
  rectangle net 3V3: 682.32,47.32 683.387,50.241
  rectangle net VBUS: 633.374,7.97 633.843,9.938
  rectangle net 3V3: 695.823,4.477 696.646,9.068
  rectangle net 3V3: 178.638,56.388 180.797,57.709
  region net 3V3: 179.169,53.899 179.169,57.683 178.484,57.683 178.484,53.899
  rectangle net 3V3: 178.638,53.899 181.927,54.204
  rectangle net 3V3: 177.14,40.386 182.22,41.199
  rectangle net 3V3: 679.425,48.641 683.387,50.241
  rectangle net NetLED224_1: 671.347,2.108 673.887,2.921
  rectangle net LED_BRIGHTNESS: 658.8,21.927 660.171,22.708
  rectangle net 3V3: 694.614,8.484 696.417,9.068
  rectangle net 3V3: 694.614,8.484 695.554,11.557
  rectangle net LED_K: 179.375,54.381 180.594,55.702
  rectangle net NetC6_2: 634.038,7.957 635.765,8.49
  rectangle net 3V3: 694.922,4.477 696.115,5.239
  region net ESP_EN: 694.337,3.258 692.737,3.258 692.737,2.597 694.337,2.597
  rectangle net ESP_EN: 693.797,2.016 694.736,6.23
  rectangle net IO0: 690.248,2.547 691.848,3.207
  rectangle net IO0: 689.867,1.988 690.807,5.239
  rectangle net LED_BCKL: 676.354,12.478 676.938,13.9
  rectangle net DIN#: 680.901,47.708 681.525,48.216
  pour cut-out: 551.416,22.695 551.416,20.828 593.979,20.828 593.979,22.695

## Silkscreen, mask and mechanical layers (free items; w line width, h text height)
Bottom Overlay:
  lines w0.127: 676.659,9.652 676.659,11.398 ; 695.477,6.274 695.757,6.553 698.221,6.553 698.754,6.02 698.754,5.436
  text "3V3" at 672.701,3.147 h1.52 r270
  text "ENABLE" at 699.186,0.18 h1.52
  text "VOLTLINK" at 683.161,0.154 h1.52
  text "BOOT" at 690.753,0.154 h1.52
Mechanical 1:
  lines w0.127: 136.41,16.796 180.7,16.796 ; 136.41,17.356 180.7,17.356 180.7,37.546 ; 136.41,78.236 180.7,78.236 180.7,58.046 ; 136.41,78.796 180.7,78.796 ; 136.98,18.066 180.7,18.066 ; 136.98,77.526 180.7,77.526
Board_outline:
  lines w0.127: 40.41,16.796 168.41,16.796 168.41,78.796 40.41,78.796 40.41,16.796
  lines w0.254: 0,0 704,0 704,370 0,370 0,0
Fabrication Layer:
  drawing of 191 lines, arcs and shapes, not listed
  text "Layer" at 713.581,360.488 h5.41
  text "Name" at 749.273,360.488 h5.41
  text "Material" at 831.874,360.488 h5.41
  text "Thickness" at 908.159,360.488 h5.41
  text "Constant" at 965.502,360.488 h5.41
  text "Board Layer Stack" at 1015.627,360.488 h5.41
  text "Top Overlay" at 749.273,349.66 h5.41
  text "Top Solder" at 749.273,338.831 h5.41
  text "Solder Resist" at 831.874,338.831 h5.41
  text "0.010mm" at 908.159,338.831 h5.41
  text "3.5" at 965.502,338.831 h5.41
  text "1" at 713.581,328.003 h5.41
  text "Top Layer" at 749.273,328.003 h5.41
  text "0.035mm" at 908.159,328.003 h5.41
  text "Dielectric 1" at 749.273,317.174 h5.41
  text "FR-4" at 831.874,317.174 h5.41
  text "1.500mm" at 908.159,317.174 h5.41
  text "4.8" at 965.502,317.174 h5.41
  text "2" at 713.581,306.346 h5.41
  text "Bottom Layer" at 749.273,306.346 h5.41
  text "0.035mm" at 908.159,306.346 h5.41
  text "Bottom Solder" at 749.273,295.518 h5.41
  text "Solder Resist" at 831.874,295.518 h5.41
  text "0.010mm" at 908.159,295.518 h5.41
  text "3.5" at 965.502,295.518 h5.41
  text "Bottom Overlay" at 749.273,284.689 h5.41
  text "Total board thickness:" at 713.581,273.861 h5.41
  text "1.590mm" at 908.159,273.861 h5.41
Drill Drawing:
  circle w0.254: c4.191,435.668 r1.734
  lines w0.254: 2.457,410.518 4.191,411.385 5.925,410.518 5.058,412.252 5.925,413.987 4.191,413.119 2.457,413.987 3.324,412.252 2.457,410.518 ; 2.457,419.19 3.324,419.19 4.191,418.323 5.058,419.19 5.925,419.19 5.058,420.057 5.925,420.925 5.058,420.925 4.191,421.792 3.324,420.925 2.457,420.925 3.324,420.057 2.457,419.19 ; 2.457,429.597 5.925,429.597 4.191,426.128 2.457,429.597 ; 2.457,441.738 5.925,441.738 5.925,445.207 2.457,445.207 2.457,441.738
  lines w0.381: -0.572,408.176 690.429,408.176 ; -0.572,447.202 690.429,447.202 ; 27.241,400.371 27.241,455.007 ; 60.522,400.371 60.522,455.007 ; 117.211,400.371 117.211,455.007 ; 142.681,400.371 142.681,455.007 ; 180.012,400.371 180.012,455.007 ; 257.508,400.371 257.508,455.007 ; 287.349,400.371 287.349,455.007 ; 325.304,400.371 325.304,455.007 ; 381.473,400.371 381.473,455.007 ; 425.046,400.371 425.046,455.007 ; 493.587,400.371 493.587,455.007 ; 562.129,400.371 562.129,455.007 ; 618.298,400.371 618.298,455.007 ; -0.572,400.371 690.429,400.371 690.429,455.007 -0.572,455.007 -0.572,400.371
  text "Symbol" at 4.112,449.544 h3.75
  text "Count" at 29.582,449.544 h3.75
  text "Hole Size" at 62.863,449.544 h3.75
  text "Plated" at 119.552,449.544 h3.75
  text "Hole Type" at 145.023,449.544 h3.75
  text "Drill Layer Pair" at 182.354,449.544 h3.75
  text "Via/Pad" at 259.85,449.544 h3.75
  text "Pad Shape" at 289.69,449.544 h3.75
  text "Template" at 327.645,449.544 h3.75
  text "Description" at 383.814,449.544 h3.75
  text "Hole Tolerance (+)" at 427.387,449.544 h3.75
  text "Hole Tolerance (-)" at 495.929,449.544 h3.75
  text "Hole Length" at 564.471,449.544 h3.75
  text "Routed Path Length" at 620.639,449.544 h3.75
  text "2" at 29.582,441.738 h3.12
  text "23.62mil (0.600mm)" at 62.863,441.738 h3.12
  text "PTH" at 119.552,441.738 h3.12
  text "Slot" at 145.023,441.738 h3.12
  text "Top Layer - Bottom Layer" at 182.354,441.738 h3.12
  text "Pad" at 259.85,441.738 h3.12
  text "Rounded" at 289.69,441.738 h3.12
  text "r90_170h60_140r45" at 327.645,441.738 h3.12
  text "55.12mil (1.400mm)" at 564.471,441.738 h3.12
  text "31.50mil (0.800mm)" at 620.639,441.738 h3.12
  text "2" at 29.582,433.933 h3.12
  text "23.62mil (0.600mm)" at 62.863,433.933 h3.12
  text "PTH" at 119.552,433.933 h3.12
  text "Slot" at 145.023,433.933 h3.12
  text "Top Layer - Bottom Layer" at 182.354,433.933 h3.12
  text "Pad" at 259.85,433.933 h3.12
  text "Rounded" at 289.69,433.933 h3.12
  text "(Mixed)" at 327.645,433.933 h3.12
  text "66.93mil (1.700mm)" at 564.471,433.933 h3.12
  text "43.31mil (1.100mm)" at 620.639,433.933 h3.12
  text "2" at 29.582,426.128 h3.12
  text "24.41mil (0.620mm)" at 62.863,426.128 h3.12
  text "NPTH" at 119.552,426.128 h3.12
  text "Round" at 145.023,426.128 h3.12
  text "Top Layer - Bottom Layer" at 182.354,426.128 h3.12
  text "Pad" at 259.85,426.128 h3.12
  text "Rounded" at 289.69,426.128 h3.12
  text "c0hn62" at 327.645,426.128 h3.12
  text "-" at 564.471,426.128 h3.12
  text "-" at 620.639,426.128 h3.12
  text "5" at 29.582,418.323 h3.12
  text "74.80mil (1.900mm)" at 62.863,418.323 h3.12
  text "PTH" at 119.552,418.323 h3.12
  text "Round" at 145.023,418.323 h3.12
  text "Top Layer - Bottom Layer" at 182.354,418.323 h3.12
  text "Pad" at 259.85,418.323 h3.12
  text "Rounded" at 289.69,418.323 h3.12
  text "(Mixed)" at 327.645,418.323 h3.12
  text "-" at 564.471,418.323 h3.12
  text "-" at 620.639,418.323 h3.12
  text "1418" at 29.582,410.518 h3.12
  text "11.81mil (0.300mm)" at 62.863,410.518 h3.12
  text "PTH" at 119.552,410.518 h3.12
  text "Round" at 145.023,410.518 h3.12
  text "Top Layer - Bottom Layer" at 182.354,410.518 h3.12
  text "(Mixed)" at 259.85,410.518 h3.12
  text "Rounded" at 289.69,410.518 h3.12
  text "(Mixed)" at 327.645,410.518 h3.12
  text "-" at 564.471,410.518 h3.12
  text "-" at 620.639,410.518 h3.12
  text "1429 Total" at 29.582,402.712 h3.12
  text "Slot definitions :" at 4.112,395.701 h3.12
  text "Routed Path Length" at 57.102,395.701 h3.12
  text "= Calculated from tool start centre position to tool end centre position." at 113.733,395.701 h3.12
  text "Hole Length" at 57.102,391.032 h3.12
  text "= Routed Path Length + Tool Size = Slot length as defined in the PCB layout" at 92.406,391.032 h3.12

## Dimensions
180.7,58.046 to 180.7,37.546 on Mechanical 1
0,370 to 0,0 on Mechanical 1
0,370 to 704,370 on Mechanical 1

## Text inside footprints (layer, text, board x,y; h text height)
J1: Bottom Overlay "1" at 178.582,37.975 h0.5 r270
J3: Bottom Overlay "PCB Edge" at 644.863,0.789 h0.8